# Altium PCB Balancer-v7.0.1.PcbDoc (part 1 of 3)
Units mil, origin at the board's own origin, x right, y up, seen from the top; angles counter-clockwise.
Board outline 2856.3 x 1161.42 mil, 2 copper layers (Top Layer, Bottom Layer), stack 30.709 mil thick; 20 components, 16 nets, 58 pads, 112 vias.
Unrouted connection lines stored in the file: 10.
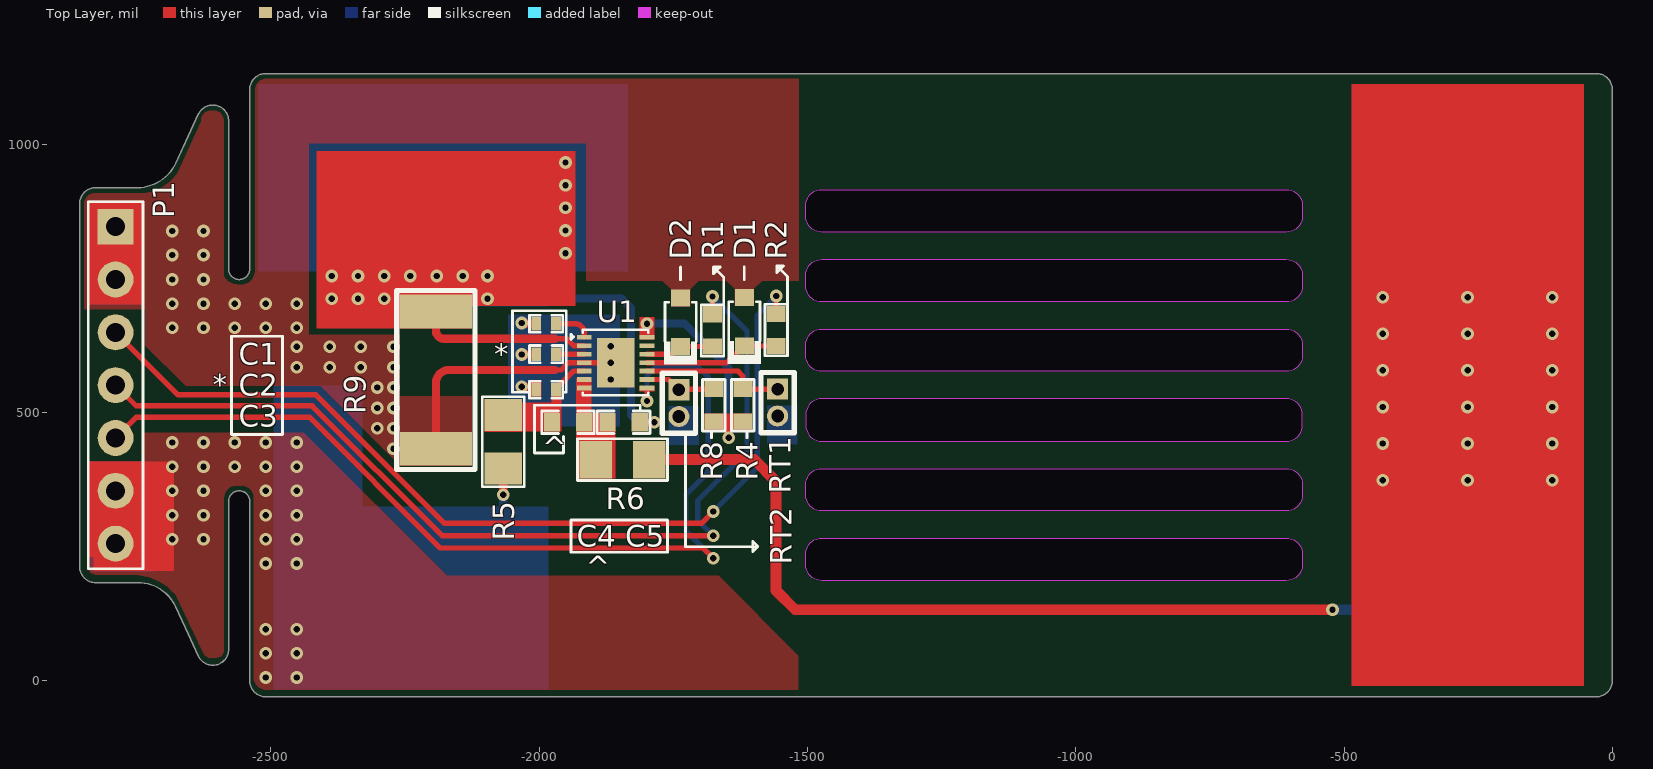
[diagram p0: Top Layer view]
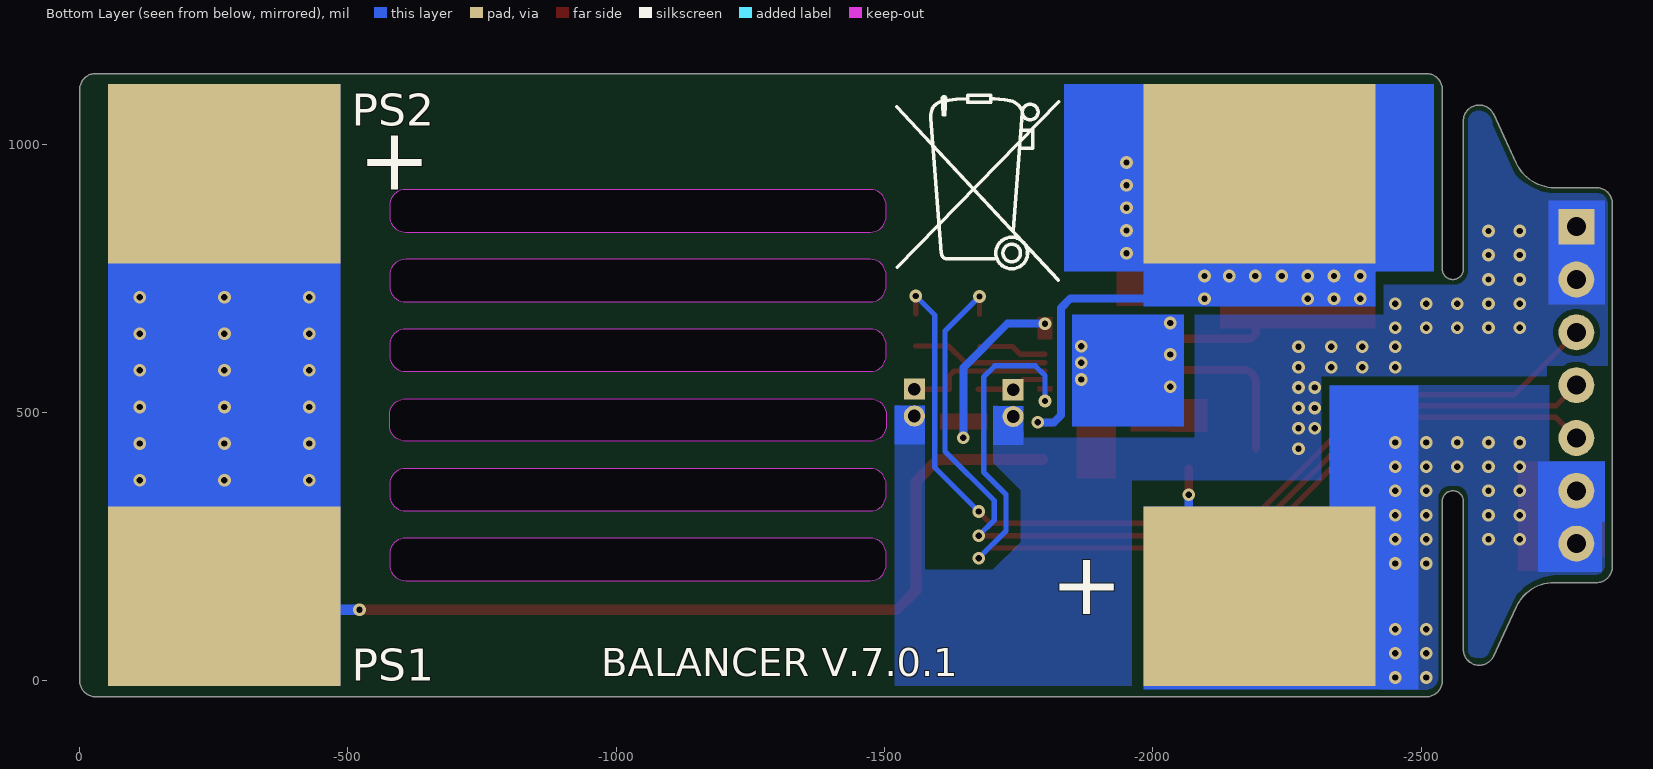
[diagram p1: Bottom Layer view, seen from below]
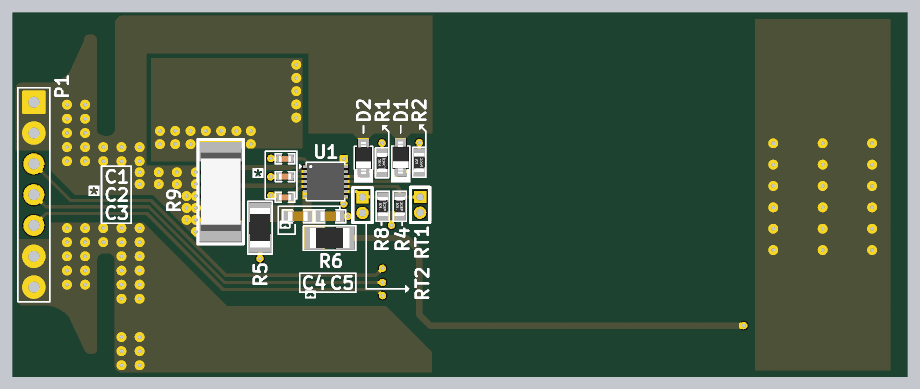
[diagram p3: 3D render of the assembled board from above, using the file's embedded part models]

## Layer stack, top to bottom
Top Solder: solder mask 0.4, Solder Resist, Dk 3.5
Top Layer: signal copper 2.9528
Dielectric 1: core 24.8031, FR-4, Dk 4.8
Bottom Layer: signal copper 2.9528
Bottom Solder: solder mask 0.4, Solder Resist, Dk 3.5

## Board outline
-2826.77,183.1 -2741.77,183.1 -2741.76,183.1 cw(c-2748.65,104.66) -2677.28,137.91 -2653.81,87.52 -2635.04,46.17 ccw(c-2608.27,58.64) -2578.74,58.64 -2578.74,334.65 cw(c-2559.06,334.65) -2539.37,334.65 -2539.37,0 ccw(c-2509.84,0) -2509.84,-29.53 -29.53,-29.53 ccw(c-29.53,0) 0,0 0,1102.36 ccw(c-29.53,1102.36) -29.53,1131.89 -2509.84,1131.89 ccw(c-2509.84,1102.36) -2539.37,1102.36 -2539.37,767.72 cw(c-2559.06,767.72) -2578.74,767.72 -2578.74,1043.72 ccw(c-2578.76,1043.73) -2578.74,1043.73 -2578.85,1046.31 ccw(c-2608.27,1043.72) -2602.34,1072.65 ccw(c-2608.27,1043.72) -2635.04,1056.19 -2654.15,1015.14 -2677.63,964.75 -2677.64,964.72 cw(c-2749,998) -2749,919.26 -2826.77,919.26 -2829.35,919.15 ccw(c-2826.77,889.73) -2856.3,889.73 -2856.3,212.63 ccw(c-2826.77,212.63)
cut-out: -1503.09,866.14 -1503.09,885.83 cw(c-1473.43,885.83) -1473.43,915.5 -607.28,915.5 cw(c-607.28,885.83) -577.61,885.83 -577.61,866.14 cw(c-607.28,866.14) -607.28,836.47 -1473.43,836.47 cw(c-1473.43,866.14)
cut-out: -1503.09,736.22 -1503.09,755.91 cw(c-1473.43,755.91) -1473.43,785.57 -607.28,785.57 cw(c-607.28,755.91) -577.61,755.91 -577.61,736.22 cw(c-607.28,736.22) -607.28,706.55 -1473.43,706.55 cw(c-1473.43,736.22)
cut-out: -1503.09,216.54 -1503.09,236.22 cw(c-1473.43,236.22) -1473.43,265.89 -607.28,265.89 cw(c-607.28,236.22) -577.61,236.22 -577.61,216.54 cw(c-607.28,216.54) -607.28,186.87 -1473.43,186.87 cw(c-1473.43,216.54)
cut-out: -1503.09,346.46 -1503.09,366.14 cw(c-1473.43,366.14) -1473.43,395.81 -607.28,395.81 cw(c-607.28,366.14) -577.61,366.14 -577.61,346.46 cw(c-607.28,346.46) -607.28,316.79 -1473.43,316.79 cw(c-1473.43,346.46)
cut-out: -1503.09,476.38 ccw(c-1473.43,476.38) -1473.43,446.71 -607.28,446.71 ccw(c-607.28,476.38) -577.61,476.38 -577.61,496.06 ccw(c-607.28,496.06) -607.28,525.73 -1473.43,525.73 ccw(c-1473.43,496.06) -1503.09,496.06
cut-out: -1503.09,606.3 -1503.09,625.98 cw(c-1473.43,625.98) -1473.43,655.65 -607.28,655.65 cw(c-607.28,625.98) -577.61,625.98 -577.61,606.3 cw(c-607.28,606.3) -607.28,576.63 -1473.43,576.63 cw(c-1473.43,606.3)

## Design rules (kind name [scope] priority, off if disabled: settings)
Clearance [All] p1: gap=10 ignorepadtopadclearanceinfootprint=TRUE except(0: Arc-Hole Track-Hole SMDPad-Hole THPad-Hole Via-Hole Fill-Hole Poly-Hole Region-Hole Text-Hole; 5: Arc-Arc Arc-Track Track-Track; 6: Arc-SMDPad Track-SMDPad; 7: Arc-Fill Arc-Poly Arc-Region Track-Fill Track-Poly Track-Region SMDPad-Fill SMDPad-Poly SMDPad-Region)
ComponentClearance [All] p1: gap=0 collisioncheckmode=3 verticalgap=0 showdistances=FALSE
MinimumSolderMaskSliver [All] p1: minsoldermaskwidth=0
PolygonConnect [All] p1: thpad.connectstyle=Relief thpad.reliefconductorwidth=15 thpad.reliefentries=4 thpad.polygonreliefangle="45 Angle" thpad.airgapwidth=10 smdpad.connectstyle=Direct smdpad.reliefconductorwidth=10 smdpad.reliefentries=4 smdpad.polygonreliefangle="90 Angle" smdpad.airgapwidth=10 via.connectstyle=Direct via.reliefconductorwidth=10 via.reliefentries=4 via.polygonreliefangle="90 Angle" via.airgapwidth=10
RoutingVias [All] p1: holewidth=11.81 width=23.62 viastyle="Through Hole" minholewidth=11.81 minwidth=23.62 maxholewidth=11.81 maxwidth=23.62
SilkToSilkClearance [All] p1: silktosilkclearance=0
SilkToSolderMaskClearance [IsPad] p1: minsilkscreentomaskgap=0 clearancetoexposedcopper=TRUE
SolderMaskExpansion [All] p1: expansion=4 istentingtop=FALSE
UnRoutedNet [All] p1: checkbadconnections=TRUE
Width [All] p1: maxlimit=40 minlimit=8 preferedwidth=10
25 further rules are at their usual default settings.

## Components (designator, comment, footprint, x,y, rotation, side; value= is the part's Value field where it differs from the comment)
C1 "0.47uF" Cap-0402 -1987.1,665.68 r0 top locked
C2 "0.47uF" Cap-0402 -1987.1,608.98 r0 top locked
C3 "0.1uF" Cap-0402 -1987.1,542.68 r0 top locked value=100nF
C4 "1nF" Cap-0603 -1946.07,481.92 r0 top locked
C5 "1nF" Cap-0603 -1842.56,481.92 r0 top locked
D1 "BZX38450-C4V7-QX" SOD-323 -1617.56,669.41 r90 top
D2 "BZX38450-C4V7-QX" SOD-323 -1736.48,668.51 r90 top
P1 "2.5mm" "Header CON" -2789.37,551.15 r270 top locked
PS1 "3.7V" "18650 CELL PAD" -2198.82,157.48 r0 bottom locked
PS2 "3.7V" "18650 CELL PAD" -269.68,944.89 r180 bottom locked
R1 "150R" Res-0603 -1677.06,653.23 r90 top locked
R2 "150R" Res-0603 -1558.15,654.13 r90 top locked
R4 "10K" Res-0603 -1620.56,513.68 r90 top locked value=10kR
R5 "10R" Res-1206 -2066.96,445.67 r90 top locked
R6 "100R" Res-1206 -1844.72,412.41 r180 top locked
R8 "10K" Res-0603 -1674.56,513.68 r90 top locked value=10kR
R9 "2.5mR" RES-2512 -2192.56,560.68 r270 top locked
RT1 "DNP NTC 10K" Thermistor -1555.56,518.68 r270 top locked
RT2 "DNP NTC 10K" Thermistor -1739.56,517.68 r270 top locked
U1 "MAX17205G+" TDFN-14-EP(3x3) -1857.6,593.23 r0 top locked

## Footprints (in the part's own frame and the unit in brackets; to place one, negate y for a bottom-side part, rotate by r counter-clockwise, add the part's x,y. Pads: shape width x height; smd on the part's side, far side on the other; paste and mask are expansions set on the pad)
"18650 CELL PAD" [mm]
  rect 11x8.5 smd: 1(0,0) 2(49,0)
Cap-0402 [mil]
  rect 18x25 smd mask+2.36: 1(-18.5,0) 2(18.5,0)
  silkscreen extent -31,-16 31,16, body extent -20,-10 20,10, height 19
Cap-0603 [mil]
  rect 30x35 smd mask+2.36: 1(-30,0) 2(30,0)
  silkscreen extent -49,-21 49,21, body extent -32,-16 31,16, height 34
"Header CON" [mm]
  rect 1.7x1.7 hole 0.9: 1(-7.5,0)
  round 1.7 hole 0.9: 2(-5,0) 3(-2.5,0) 4(0,0) 5(2.5,0) 6(5,0) 7(7.5,0)
  silkscreen extent -8.69,-1.3 8.69,1.3
Res-0603 [mil]
  rect 30x35 smd: 1(-30,0) 2(30,0)
  silkscreen extent -48,-21 48,21, body extent -31,-17 31,17, height 18
Res-1206 [mil]
  rect 60x70 smd: 1(-50,0) 2(50,0)
  silkscreen extent -84,-39 84,39, body extent -63,-31 63,31, height 24
RES-2512 [mm]
  rect 1.6x3.4 smd: 1(-3.25,0) 2(3.25,0)
  silkscreen extent -4.24,-1.85 4.24,1.85, body extent -3.17,-1.63 3.18,1.63, height 0.58
SOD-323 [mm]
  rect 0.8x0.9 smd mask+0.055: 1(-1.15,0) 2(1.15,0)
  silkscreen extent -2.01,-0.79 0.94,0.79, body extent -1.3,-0.67 1.3,0.67, height 1.1
TDFN-14-EP(3x3) [mm]
  rect 0.7x0.22 smd: 1(-1.485,1.2) 2(-1.485,0.8) 3(-1.485,0.4) 4(-1.485,0) 5(-1.485,-0.4) 6(-1.485,-0.8) 7(-1.485,-1.2) 8(1.485,-1.2) 9(1.485,-0.8) 10(1.485,-0.4) 11(1.485,0) 12(1.485,0.4) 13(1.485,0.8) 14(1.485,1.2)
  rect 1.78x2.35 smd paste-2: 15(0,0)
  silkscreen extent -2.11,-1.55 1.55,1.55, body extent -1.5,-1.5 1.5,1.5, height 0.77
Thermistor [mm]
  rect 1x1 hole 0.6: 1(-0.635,0)
  round 1 hole 0.6: 2(0.635,0)
  silkscreen extent -1.42,-0.79 1.42,0.79

## Part data
C1 C2: library part GRM155R71C474KE01D, "CAP CER 0.47uF, 16V, X7R, 10% Tol, 0402 Multilayer Ceramic Capacitors MLCC - SMD/SMT ROHS", LCSC Part Number=C471404, Manufacturer="Murata Electronics", Package=0402, Item Type=Capacitor, Manufacturer Part Number=GRM155R71C474KE01D
C3: library part 04023C104KAT2A, "CAP CER, 0.1 uF, 25 V, ± 10%, X7R, 0402 [1005 Metric]", Case Code (Imperial)=0402, Case Code (Metric)=1005, Dielectric=X7R, Manufacturer="Kyocera AVX", Max Operating Temperature=125°C, Min Operating Temperature=-55°C, Supplier Part Number=1867948, Tolerance=10%, Voltage=25V, Case/Package=0402, Category="Ceramic Capacitors", ComponentLink1Description=https://datasheet.ciiva.com/7614/cx7r-7614663.pdf?src-supplier=Digi-Key, ComponentLink1URL=https://datasheet.ciiva.com/7614/cx7r-7614663.pdf?src-supplier=Digi-Key, ComponentLink2Description=https://datasheet.ciiva.com/6265/cx7r-6265272.pdf?src-supplier=Digi-Key, ComponentLink2URL=https://datasheet.ciiva.com/6265/cx7r-6265272.pdf?src-supplier=Digi-Key, ComponentLink3Description=https://datasheet.ciiva.com/1123/1679506-1123344.pdf?src-supplier=Element14, ComponentLink3URL=https://datasheet.ciiva.com/1123/1679506-1123344.pdf?src-supplier=Element14, ComponentLink4Description=https://datasheet.ciiva.com/14906/cx7r-14906223.pdf?src-supplier=Digi-Key, ComponentLink4URL=https://datasheet.ciiva.com/14906/cx7r-14906223.pdf?src-supplier=Digi-Key, ComponentLink5Description=https://datasheet.ciiva.com/7709/1679506-7709527.pdf?src-supplier=Element14, ComponentLink5URL=https://datasheet.ciiva.com/7709/1679506-7709527.pdf?src-supplier=Element14, ComponentLink6Description=Farnell, ComponentLink6URL=https://uk.farnell.com/avx/04023c104kat2a/cap-0-1-f-25v-10-x7r-0402/dp/1867948, Item Type=Capacitor, Lead Free=5697LeadFree, Manufacturer Part Number=04023C104KAT2A, Material=4241ConductorMaterial, Mounting Technology="Surface Mount", Packaging="Cut Tape", Pins=2, Pricing="10=0.027, 100=0.014, 500=0.009, 2500=0.007, 5000=0.0069 (GBP)", Reach SVHC Compliant=No, RoHS=Yes, RoHS Compliant=Yes, Series=-, Stock=226682, Supplier=Farnell, Voltage Rating=25V, Voltage Rating (DC)=25V, Width=1mm
C4 C5: library part C0603C102K3RACAUTO, "CAP CER, 1000 pF, 25 V, ± 10%, X7R, 0603 [1608 Metric]", Case Code (Imperial)=0603, Case Code (Metric)=1608, Dielectric=X7R, Dielectric Material=Ceramic, Manufacturer=KEMET, Max Operating Temperature=125°C, Min Operating Temperature=-55°C, Package Quantity=1, Ratings=AEC-Q200, Supplier Part Number=07X0745, Tolerance=10%, Voltage Rating=25V, Category="Ceramic Capacitors", ComponentLink1Description=https://datasheet.ciiva.com/23913/1751276-23913166.pdf?src-supplier=Newark, ComponentLink1URL=https://datasheet.ciiva.com/23913/1751276-23913166.pdf?src-supplier=Newark, ComponentLink2Description=https://datasheet.ciiva.com/26847/getdatasheetpartid-429233-26847500.pdf?src-supplier=Verical, ComponentLink2URL=https://datasheet.ciiva.com/26847/getdatasheetpartid-429233-26847500.pdf?src-supplier=Verical, ComponentLink3Description=Newark, ComponentLink3URL=https://www.newark.com/kemet/c0603c102k3racauto/mlcc-capacitor-1000pf-25v-x7r/dp/07X0745, Construction=Flat, Depth=0.8mm, Height=0.8mm, Item Type=Capacitor, Length=1.6mm, Manufacturer Part Number=C0603C102K3RACAUTO, Mounting Technology="Surface Mount", Package=0603, Packaging="Cut Tape", Pricing="1=0.014 (USD)", Radiation Hardening=No, Reach SVHC Compliant=No, RoHS=Yes, RoHS Compliant=Yes, Series=C, Stock=3765, Supplier=Newark, Thickness=0.034inch, Voltage Rating (DC)=25V, Width=0.031inch
D1 D2: "Zener Diode 4.7 V 300 mW ±5% Surface Mount SOD-323", Manufacturer="Nexperia USA Inc.", Package="SC-76, SOD-323", ComponentLink1Description=Farnell, ComponentLink1URL=https://uk.farnell.com/nexperia/bzx38450-c4v7-qx/zener-diode-4-7v-0-3w-sc-76/dp/3868843, ComponentLink2Description=Digikey, ComponentLink2URL=https://www.digikey.com/en/products/detail/nexperia-usa-inc/BZX38450-C4V7-QX/16368564, Item Type=Diode, Manufacturer Part Number=BZX38450-C4V7-QX
P1: library part "Header CON 2.5mm", "2.5mm Pitch, 7 Pin header Connector"
PS1 PS2: library part "18650 CELL", "Will only be pads on PCB for Welding. Not CELL holder"
R1 R2: library part MCWR06X1500FTL, "SMD RES, 150 Ohm, General Purpose Thick Film 0603 1% 1/10W ±100ppm/°C Ceramic Paper T/R", Case Code (Imperial)=0603, Case Code (Metric)=1608, Manufacturer=Multicomp, Power Rating=100mW, Resistance Tolerance=1%, Resistor Type="Thick Film", Supplier Part Number=2446572, Temperature Coefficient=100ppm/°C, Voltage Rating=50V, Case/Package=0603, ComponentLink1Description=http://www.farnell.com/datasheets/2563624.pdf?src-supplier=Farnell, ComponentLink1URL=http://www.farnell.com/datasheets/2563624.pdf?src-supplier=Farnell, ComponentLink2Description=http://www.farnell.com/datasheets/2860681.pdf?src-supplier=Farnell, ComponentLink2URL=http://www.farnell.com/datasheets/2860681.pdf?src-supplier=Farnell, ComponentLink3Description=https://datasheet.octopart.com/MCWR06X1500FTL-Multicomp-datasheet-100454308.pdf?src-supplier=Farnell, ComponentLink3URL=https://datasheet.octopart.com/MCWR06X1500FTL-Multicomp-datasheet-100454308.pdf?src-supplier=Farnell, ComponentLink4Description=http://www.farnell.com/datasheets/1849611.pdf?src-supplier=Element14, ComponentLink4URL=http://www.farnell.com/datasheets/1849611.pdf?src-supplier=Element14, ComponentLink5Description=http://www.farnell.com/datasheets/2563624.pdf?src-supplier=Newark, ComponentLink5URL=http://www.farnell.com/datasheets/2563624.pdf?src-supplier=Newark, Item Type=Resistor, Manufacturer Part Number=MCWR06X1500FTL, Packaging="Tape and Reel", Pricing="5000=0.001, 25000=0.0009, 50000=0.0008 (GBP)", Reach SVHC Compliant=No, RoHS=Yes, Stock=85000, Supplier=Farnell, Voltage Rating (DC)=50V
R4 R8: library part RE0603DRE0710KL, "SMD RES, 10KOhm, ± 0.5%, 100 mW, 0603 [1608 Metric], Thick Film, Ultra Precision", Case/Package=0603, Manufacturer=Yageo, Max Operating Temperature=155°C, Max Power Dissipation=100mW, Min Operating Temperature=-55°C, Supplier Part Number=1840588, Temperature Coefficient=50ppm/°C, Tolerance=0.5%, Category="Chip SMD Resistors", ComponentLink1Description=http://www.yageo.com/NewPortal/yageodocoutput?fileName=/pdf/R-Chip/PYu-RE_105_RoHS_L_6.pdf&src-supplier=Digi-Key, ComponentLink1URL=http://www.yageo.com/NewPortal/yageodocoutput?fileName=/pdf/R-Chip/PYu-RE_105_RoHS_L_6.pdf&src-supplier=Digi-Key, ComponentLink2Description=Farnell, ComponentLink2URL=https://uk.farnell.com/yageo/re0603dr-0710kl/res-10k-0-5-0-1w-0603-thick-film/dp/1840588, Features="Moisture Resistant", Height=0.022inch, Item Type=Resistor, Length=0.063inch, Manufacturer Part Number=RE0603DRE0710KL, Number of Terminations=2, Packaging="Tape and Reel", Pricing="10=0.025, 100=0.014, 500=0.013, 1000=0.011, 2500=0.009, 5000=0.007, 25000=0.006, 50000=0.005 (GBP)", RoHS=Yes, RoHS Compliant=Yes, Series=RE, Stock=3920, Supplier=Farnell, Width=0.032inch
R5: library part RC1206FR-0710RL, "SMD RES, 10 Ohm, ± 1%, 250 mW, 1206 [3216 Metric], Thick Film, General Purpose", Case Code (Metric)=3216, Case/Package=1206, Manufacturer=Yageo, Max Operating Temperature=155°C, Max Power Dissipation=250mW, Min Operating Temperature=-55°C, Resistance Tolerance=1%, Resistor Type="Thick Film", Supplier Part Number=2421908, Temperature Coefficient=200ppm/°C, Voltage Rating=200V, Category="Chip SMD Resistors", ComponentLink1Description=https://datasheet.ciiva.com/11819/0900766b80c6630a-11819896.pdf?src-supplier=Rs, ComponentLink1URL=https://datasheet.ciiva.com/11819/0900766b80c6630a-11819896.pdf?src-supplier=Rs, ComponentLink2Description=https://datasheet.ciiva.com/22735/444357-22735648.pdf?src-supplier=Farnell, ComponentLink2URL=https://datasheet.ciiva.com/22735/444357-22735648.pdf?src-supplier=Farnell, ComponentLink3Description=https://datasheet.ciiva.com/29181/402303-da-01-en-smd-widerstand-chip1206-10-ohm-29181572.pdf?src-supplier=Conrad, ComponentLink3URL=https://datasheet.ciiva.com/29181/402303-da-01-en-smd-widerstand-chip1206-10-ohm-29181572.pdf?src-supplier=Conrad, ComponentLink4Description=https://datasheet.ciiva.com/46445/444357-46445704.pdf?src-supplier=Element14, ComponentLink4URL=https://datasheet.ciiva.com/46445/444357-46445704.pdf?src-supplier=Element14, ComponentLink5Description=https://datasheet.ciiva.com/2460/pyu-rc1206-51-rohs-l-4-2460048.pdf?src-supplier=Digi-Key, ComponentLink5URL=https://datasheet.ciiva.com/2460/pyu-rc1206-51-rohs-l-4-2460048.pdf?src-supplier=Digi-Key, ComponentLink6Description=https://datasheet.ciiva.com/2460/pyu-rc1206-51-rohs-l-4-2460049.pdf?src-supplier=Digi-Key, ComponentLink6URL=https://datasheet.ciiva.com/2460/pyu-rc1206-51-rohs-l-4-2460049.pdf?src-supplier=Digi-Key, ComponentLink7Description=https://datasheet.ciiva.com/2460/pyu-rc1206-51-rohs-l-4-2460050.pdf?src-supplier=Digi-Key, ComponentLink7URL=https://datasheet.ciiva.com/2460/pyu-rc1206-51-rohs-l-4-2460050.pdf?src-supplier=Digi-Key, ComponentLink8Description=https://datasheet.ciiva.com/16962/pyu-rc1206-51-rohs-l-4-16962857.pdf?src-supplier=Future+Electronics, ComponentLink8URL=https://datasheet.ciiva.com/16962/pyu-rc1206-51-rohs-l-4-16962857.pdf?src-supplier=Future+Electronics, ComponentLink9Description=Farnell, ComponentLink9URL=https://uk.farnell.com/yageo/rc1206fr-0710rl/res-10r-1-0-25w-1206-thick-film/dp/2421908, Depth=1.6mm, Features="Moisture Resistant", Height=0.55mm, Item Type=Resistor, Lead Free="Lead Free", Length=3.1mm, Manufacturer Part Number=RC1206FR-0710RL, Number of Terminations=2, Package=1206, Packaging="Tape and Reel", Pins=2, Power Rating=250mW, Pricing="5000=0.016, 25000=0.014, 50000=0.012 (GBP)", Reach SVHC Compliant=No, RoHS=Yes, RoHS Compliant=Yes, Series=RC, Stock=95000, Supplier=Farnell, Technology="THICK FILM", Termination=SMD/SMT, Tolerance=1%, Voltage Rating (AC)=200V, Voltage Rating (DC)=200V, Width=1.6mm
R6: library part RC1206FR-07100RL, "SMD RES, 100 Ohm, ± 1%, 250 mW, 1206 [3216 Metric], Thick Film, General Purpose", Case Code (Imperial)=1206, Case Code (Metric)=3216, Manufacturer=Yageo, Max Operating Temperature=155°C, Max Power Dissipation=250mW, Min Operating Temperature=-55°C, Package Quantity=5000, Resistance Tolerance=1%, Resistor Type="Thick Film", Supplier Part Number=9240888, Temperature Coefficient=100ppm/°C, Voltage Rating=200V, Category="Chip SMD Resistors", ComponentLink1Description=https://datasheet.ciiva.com/11808/0900766b80c6630a-11808606.pdf?src-supplier=Rs, ComponentLink1URL=https://datasheet.ciiva.com/11808/0900766b80c6630a-11808606.pdf?src-supplier=Rs, ComponentLink2Description=https://datasheet.ciiva.com/46445/444357-46445702.pdf?src-supplier=Element14, ComponentLink2URL=https://datasheet.ciiva.com/46445/444357-46445702.pdf?src-supplier=Element14, ComponentLink3Description=https://datasheet.ciiva.com/7857/444357-7857241.pdf?src-supplier=Element14, ComponentLink3URL=https://datasheet.ciiva.com/7857/444357-7857241.pdf?src-supplier=Element14, ComponentLink4Description=https://datasheet.ciiva.com/7857/444357-7857242.pdf?src-supplier=Element14, ComponentLink4URL=https://datasheet.ciiva.com/7857/444357-7857242.pdf?src-supplier=Element14, ComponentLink5Description=Farnell, ComponentLink5URL=https://uk.farnell.com/yageo/rc1206fr-07100rl/res-100r-1-0-25w-1206-thick-film/dp/9240888, Depth=1.6mm, Features="Moisture Resistant", Height=0.55mm, Item Type=Resistor, Lead Free="Lead Free", Length=3.1mm, Manufacturer Part Number=RC1206FR-07100RL, Number of Terminations=2, Package=1206, Packaging="Tape and Reel", Power Rating=250mW, Pricing="10=0.022, 100=0.013, 500=0.011, 1000=0.009, 2500=0.0088 (GBP)", Reach SVHC Compliant=Unknown, RoHS=Yes, RoHS Compliant=Yes, Series=RC, Stock=538979, Supplier=Farnell, Technology="THICK FILM", Termination=SMD/SMT, Tolerance=1%, Voltage Rating (AC)=200V, Width=1.6mm
R9: library part PA2512FKF7W2U5E, "SMD Current Sense Resistor, 0.0025 ohm, PA Series, 2512 [6432 Metric], 2W, ± 1%, Metal Strip", Manufacturer=YAGEO, Package=2512, ComponentLink1Description=Farnell, ComponentLink1URL=https://nl.farnell.com/yageo/pa2512fkf7w2u5e/res-r0025-1-2w-2512-metal-strip/dp/4169831, Item Type=Resistor, Manufacturer Part Number=PA2512FKF7W2U5E
RT1 RT2: library part Thermister, "NTC Thermister 10K"
U1: "Stand-Alone ModelGauge m5 Fuel Gauge with SHA-256 Authentication", Manufacturer=Maxim, Max Operating Temperature=85°C, Max Supply Voltage=20V, Min Operating Temperature=-40°C, Min Supply Voltage=4.2V, Package=TDFN-14-EP(3x3), Category="Battery Management", ComponentLink1Description=http://www.farnell.com/datasheets/2339113.pdf?src-supplier=Farnell, ComponentLink1URL=http://www.farnell.com/datasheets/2339113.pdf?src-supplier=Farnell, ComponentLink2Description=http://www.mouser.com/ds/2/256/MAX17201-MAX17215-909430.pdf?src-supplier=Mouser, ComponentLink2URL=http://www.mouser.com/ds/2/256/MAX17201-MAX17215-909430.pdf?src-supplier=Mouser, ComponentLink3Description=https://datasheets.maximintegrated.com/en/ds/MAX17201-MAX17215.pdf?src-supplier=Digi-Key, ComponentLink3URL=https://datasheets.maximintegrated.com/en/ds/MAX17201-MAX17215.pdf?src-supplier=Digi-Key, ComponentLink4Description=http://www.farnell.com/datasheets/2034561.pdf?src-supplier=Element14, ComponentLink4URL=http://www.farnell.com/datasheets/2034561.pdf?src-supplier=Element14, Interface=I2C, Item Type=IC, Manufacturer Part Number=MAX17205G+, Number of Pins=14, Packaging=Rail/Tube, Pricing 1="1=6.58, 10=5.913, 25=5.5904, 80=4.845, 230=4.59652, 490=4.12443, 980=3.47844, 2450=3.30452 (USD)", Reach SVHC Compliant=Unknown, RoHS=Yes, RoHS Compliant=Yes, Series=ModelGauge™, Stock 1=490, Supplier 1=Digi-Key

## Via types
v1: diameter 23.62, hole 11.81, Top Layer to Bottom Layer, 112 vias

## Nets (pads, with @x,y where several pads share a name; then routed paths per layer and width w, separated by ;. In a path a pad name is that pad's centre, name@x,y a point inside that pad or via, vN(x,y) a via of type N, cw(c..) or ccw(c..) an arc to the next point about the centre after c; other vN are vias at no path point)
ALRT: P1.5 U1.8 | length 1815.1
  Top Layer w10: P1.5@-2789.37,452.72 -2750.66,491.43 -2428.43,491.43 -2184.68,247.68 -1694.56,247.68 v1(-1675.56,228.68) ; U1.8@-1799.14,544.06 -1799.14,521.78 v1(-1799.04,521.68)
  Bottom Layer w10: v1(-1799.04,521.68) -1799.04,568.86 -1780.58,587.31 -1705.56,587.31 -1684.56,566.31 -1684.56,389.57 -1726.44,347.7 -1726.44,279.55 v1(-1675.56,228.68)
C1: P1.6 P1.7 PS1.1 R5.1 | length 391.2
  Top Layer w15: P1.7@-2789.37,255.87 P1.6@-2789.37,354.3 ; v1(-2066.96,346.68) R5.1@-2066.96,395.67
  Bottom Layer w15: PS1.1@-2198.82,157.48 -2066.96,289.33 v1(-2066.96,346.68)
  other v1: -2509.56,6.29 -2451.56,6.29 -2509.56,51.29 -2451.56,51.29 -2509.56,96.29 -2451.56,96.29 -2509.56,218.68 -2451.56,218.68 -2683.56,263.68 -2625.56,263.68 -2509.56,263.68 -2451.56,263.68 -2683.56,308.68 -2625.56,308.68 -2509.56,308.68 -2451.56,308.68 -2683.56,354.3 -2625.56,354.3 -2509.56,354.3 -2451.56,354.3 -2683.56,399.3 -2625.56,399.3 -2567.56,399.3 -2509.56,399.3 -2451.56,399.3 -2683.56,444.3 -2625.56,444.3 -2567.56,444.3 -2509.56,444.3 -2451.56,444.3
C2: PS1.2 PS2.1 R6.1 | length 1770.3
  Top Layer w20: R6.1@-1794.72,412.41 -1599.27,412.41 -1558.67,371.82 -1558.67,168.46 -1522.89,132.68 v1(-521.56,132.68)
  Bottom Layer w20: v1(-521.56,132.68) -294.48,132.68 PS1.2@-269.68,157.48
  other v1: -427.56,374.11 -269.68,374.11 -111.8,374.11 -427.56,442.33 -269.68,442.33 -111.8,442.33 -427.56,510.56 -269.68,510.56 -111.8,510.56 -427.56,578.79 -269.68,578.79 -111.8,578.79 -427.56,647.01 -269.68,647.01 -111.8,647.01 -427.56,715.24 -269.68,715.24 -111.8,715.24
C2-: C5.2 PS2.2 R9.1 U1.2 | length 940
  Top Layer w10: -1970.56,637.68 -1948.84,637.68 -1935.89,624.73 U1.2@-1916.07,624.73
  Top Layer w15: R9.1@-2192.56,688.63 -2192.56,653.18 ccw(c-2177.06,653.18) -2177.06,637.68 -1970.56,637.68 ; C5.2@-1812.56,481.92 v1(-1785.36,481.92)
  Bottom Layer w15: PS2.2@-2198.82,904.94 PS2.2@-2177.6,904.94 ; v1(-2142.28,754.68) v1@-2136.9,760.06 ; v1(-2096.28,712.45) -1846.19,712.45 -1828.9,695.16 -1828.9,495.11 -1815.71,481.92 v1(-1785.36,481.92) ; PS2.2@-2057.72,785.06 -2057.72,763.85 -2048.55,754.68
  other v1: -2386.56,712.45 -2337.71,712.45 -2288.85,712.45 -2386.56,754.68 -2337.71,754.68 -2288.85,754.68 -2239.99,754.68 -2191.13,754.68 -2096.28,754.68 -1951,797.23 -1951,839.45 -1951,881.68 -1951,923.91 -1951,966.13
GND: C1.1 C2.1 C3.1 D1.2 D2.2 P1.1 P1.2 R9.2 RT1.2 RT2.2 U1.4 U1.15 | length 563.4
  Top Layer w10: v1@-2031.56,608.37 v1@-2031.26,608.68 ; C2.1@-2004.91,608.68 C2.1@-2004.6,608.98 ; -1970.56,579.49 -1958.81,579.49 -1945.07,593.23 U1.4@-1916.07,593.23 U1.15@-1857.6,593.23
  Top Layer w15: R9.2@-2192.56,432.73 -2192.56,554.68 cw(c-2167.75,554.68) -2167.75,579.49 -1970.56,579.49 ; v1@-2032.26,608.68 C2.1@-2005.91,608.68 ; v1@-2031.91,666.34 C1.1@-2006.22,666.34 ; v1@-2031.56,666.99 v1@-2030.91,666.34 ; v1@-2030.91,546.83 -2032.09,548 -2008.27,548 -2005.6,545.33 C3.1@-2005.6,542.68 ; C1.1@-2005.22,666.34 C1.1@-2004.58,665.7
  other v1: -2271.56,432.68 -2301.56,470.68 -2271.56,470.68 -2301.56,508.68 -2271.56,508.68 -2301.56,546.68 -2271.56,546.68 -2032.56,548.48 -1866.56,561.68 -2451.56,584.68 -2390.56,584.68 -2332.56,584.68 -2271.56,584.68 -1866.56,592.68 -2032.56,608.37 -2451.56,622.68 -2390.56,622.68 -2332.56,622.68 -2271.56,622.68 -1866.56,623.68 -2683.56,658 -2625.56,658 -2567.56,658 -2509.56,658 -2451.56,658 -2032.56,666.99 -2683.56,703 -2625.56,703 -2567.56,703 -2509.56,703 -2451.56,703 -2683.56,748 -2625.56,748 -2683.56,793.61 -2625.56,793.61 -2683.56,838.61 -2625.56,838.61
NetC1_2: C1.2 U1.1 | length 68.6
  Top Layer w10: C1.2@-1967.6,665.68 -1933.39,665.68 cw(c-1933.39,648.35) -1916.07,648.35 U1.1@-1916.07,641.15
NetC2_2: C2.2 U1.3 | length 51.5
  Top Layer w10: C2.2@-1967.6,608.98 U1.3@-1916.07,608.98
NetC3_2: C3.2 C4.1 R5.2 U1.5 | length 75.2
  Top Layer w10: C3.2@-1971.6,542.18 -1963.6,550.18 -1963.2,550.18 -1935.89,577.48 U1.5@-1916.07,577.48
  Top Layer w15: R5.2@-2066.96,505.68 R5.2@-2061.96,505.68
NetC4_2: C4.2 C5.1 R6.2 U1.6 U1.7
NetD1_1: D1.1 R2.1 U1.11 | length 253.8
  Top Layer w10: U1.11@-1799.14,593.23 -1650.43,593.23 -1619.53,624.13 D1.1@-1617.56,624.13 R2.1@-1558.15,624.13
NetD2_1: D2.1 R1.1 U1.12 | length 128
  Top Layer w10: U1.12@-1799.14,608.98 -1752.7,608.98 -1738.45,623.23 D2.1@-1736.48,623.23 R1.1@-1677.06,623.23
NetR4_2: R4.2 RT1.1 U1.10 | length 271.9
  Top Layer w10: U1.10@-1799.14,577.48 -1629.84,577.48 -1620.56,568.21 R4.2@-1620.56,543.68 RT1.1@-1555.56,543.68
NetR8_2: R8.2 RT2.1 U1.9 | length 134.3
  Top Layer w10: U1.9@-1799.14,561.74 -1758.62,561.74 RT2.1@-1739.56,542.68 -1738.56,543.68 R8.2@-1678.15,543.68 ; R8.2@-1679.15,542.68 R8.2@-1678.15,543.68 ; R8.2@-1674.56,543.68 R8.2@-1678.15,543.68
SCL: P1.3 R2.2 | length 1753.8
  Top Layer w10: P1.3@-2789.37,649.57 -2672.77,532.98 -2415.85,532.98 -2176.55,293.68 -1697.56,293.68 v1(-1675.56,315.68) ; R2.2@-1558.15,684.13 v1(-1558.15,717.31)
  Bottom Layer w10: v1(-1675.56,315.68) -1593.56,397.68 -1593.56,681.89 v1(-1558.15,717.31)
SDA: P1.4 R1.2 | length 1785.7
  Top Layer w10: P1.4@-2789.37,551.15 -2750.93,512.71 -2423.18,512.71 -2181.15,270.68 v1(-1675.56,270.68) ; R1.2@-1677.06,683.23 v1(-1677.06,716.41)
  Bottom Layer w10: v1(-1677.06,716.41) -1612.56,651.91 -1612.56,427.73 -1704.59,335.7 -1704.59,299.71 v1(-1675.56,270.68)
THRM: R4.1 R8.1 U1.14 | length 345.2
  Top Layer w10: v1@-1799.09,665.63 v1(-1799.04,665.68)
  Top Layer w15: v1(-1646.84,453.33) -1646.84,481.92
  Bottom Layer w15: v1(-1799.04,665.68) -1728.8,665.68 -1646.84,583.73 v1(-1646.84,453.33)
pads on no net: U1.13

## Polygon pours and split planes (outlines as drawn)
C1 on Top Layer "C1_L01_P006" (solid, pour order 6): -1665.68,195.68 -1517,47 -1517,-16.32 -2508.56,-16.32 cw(c-2508.57,6.68) -2531.56,6.68 -2531.56,341.68 ccw(c-2553.56,341.69) -2553.56,363.68 -2564.56,363.68 ccw(c-2564.57,340.68) -2587.56,340.68 -2587.56,67.46 -2587.56,57.42 cw(c-2601.82,56.94) -2601.35,42.68 -2607.56,42.68 cw(c-2610,61.36) -2627.31,53.93 -2677.37,160.49 -2685.27,168.39 ccw(c-2755.97,97.72) -2755.98,197.68 -2823.98,197.68 cw(c-2823.98,216.27) -2842.56,216.27 -2842.56,409.26 -2738.56,409.26 -2738.56,462.68 -2438.56,462.68 -2171.56,195.68
GND on Top Layer "GND_L01_P003" (solid, pour order 3): -1650.91,746.06 -1702.23,746.06 -1718.76,729.53 -1718.76,698.04 -1754.2,698.04 -1754.2,729.53 -1770.73,746.06 -1912,746.06 -1912,1002 -2429,1002 -2429,645 -2259.49,645 -2259.49,530.18 -2125.63,530.18 -2125.63,401.23 -2259.11,401.23 -2290.75,432.49 -2407.94,549.68 -2659.12,549.68 -2734.31,624.88 -2734.31,692.68 -2847.56,692.68 -2847.56,888 -2847.43,888.14 -2847.43,889.53 cw(c-2827.43,889.53) -2841.56,903.68 cw(c-2829.51,891.67) -2829.49,908.68 -2743.56,908.68 ccw(c-2743.56,988.59) -2687.05,932.09 -2674.25,944.89 -2629.56,1042.68 -2629.56,1045.87 cw(c-2612.74,1045.87) -2612.74,1062.7 -2604.82,1062.7 cw(c-2604.78,1048.17) -2594.49,1058.42 cw(c-2611.35,1041.51) -2587.47,1041.48 -2587.47,757.46 ccw(c-2574.41,757.46) -2583.65,748.22 ccw(c-2560.62,771.24) -2560.62,738.68 -2554.56,738.68 ccw(c-2554.56,763.68) -2529.56,763.68 -2529.56,1099.68 cw(c-2506.56,1099.68) -2506.56,1122.68 -1516.56,1122.68 -1516.56,746.06 -1584.21,746.06 -1599.85,730.43 -1599.85,698.93 -1635.28,698.93 -1635.28,730.43
GND on Bottom Solder "NONET_L01_P-001" (solid): -2721.89,578.84 -2650.02,578.84 ccw(c-2650.02,584.84) -2644.02,584.84 ccw(c-2650.02,584.84) -2650.02,590.84 -2721.89,590.84 ccw(c-2721.89,584.84) -2727.89,584.84 ccw(c-2721.89,584.84)
GND on Bottom Solder "NONET_L01_P-001" (solid): -2618.76,578.84 -2546.89,578.84 ccw(c-2546.89,584.84) -2540.89,584.84 ccw(c-2546.89,584.84) -2546.89,590.84 -2618.76,590.84 ccw(c-2618.76,584.84) -2624.76,584.84 ccw(c-2618.76,584.84)
GND on Bottom Solder "NONET_L01_P-001" (solid): -2721.89,600.55 -2650.02,600.55 ccw(c-2650.02,606.55) -2644.02,606.55 ccw(c-2650.02,606.55) -2650.02,612.55 -2721.89,612.55 ccw(c-2721.89,606.55) -2727.89,606.55 ccw(c-2721.89,606.55)
GND on Bottom Solder "NONET_L01_P-001" (solid): -2721.89,622.26 -2650.02,622.26 ccw(c-2650.02,628.26) -2644.02,628.26 ccw(c-2650.02,628.26) -2650.02,634.26 -2721.89,634.26 ccw(c-2721.89,628.26) -2727.89,628.26 ccw(c-2721.89,628.26)
GND on Bottom Solder "NONET_L01_P-001" (solid): -2546.89,600.55 -2618.76,600.55 cw(c-2618.76,606.55) -2624.76,606.55 cw(c-2618.76,606.55) -2618.76,612.55 -2546.89,612.55 cw(c-2546.89,606.55) -2540.89,606.55 cw(c-2546.89,606.55)
GND on Bottom Solder "NONET_L01_P-001" (solid): -2618.76,634.26 -2546.89,634.26 cw(c-2546.89,628.26) -2540.89,628.26 cw(c-2546.89,628.26) -2546.89,622.26 -2618.76,622.26 cw(c-2618.76,628.26) -2624.76,628.26 cw(c-2618.76,628.26)
C2- on Bottom Solder "NONET_L01_P-001" (solid): -1844.06,798 -1915.94,798 ccw(c-1915.94,792) -1921.94,792 ccw(c-1915.94,792) -1915.94,786 -1844.06,786 ccw(c-1844.06,792) -1838.06,792 ccw(c-1844.06,792)
C2- on Bottom Solder "NONET_L01_P-001" (solid): -1916.19,829.42 -1844.32,829.42 ccw(c-1844.32,835.42) -1838.32,835.42 ccw(c-1844.32,835.42) -1844.32,841.42 -1916.19,841.42 ccw(c-1916.19,835.42) -1922.19,835.42 ccw(c-1916.19,835.42)
C2- on Bottom Solder "NONET_L01_P-001" (solid): -1915.94,807.71 -1844.06,807.71 ccw(c-1844.06,813.71) -1838.06,813.71 ccw(c-1844.06,813.71) -1844.06,819.71 -1915.94,819.71 ccw(c-1915.94,813.71) -1921.94,813.71 ccw(c-1915.94,813.71)
C2- on Bottom Solder "NONET_L01_P-001" (solid): -1844.19,884.84 -1916.06,884.84 ccw(c-1916.06,878.84) -1922.06,878.84 ccw(c-1916.06,878.84) -1916.06,872.84 -1844.19,872.84 ccw(c-1844.19,878.84) -1838.19,878.84 ccw(c-1844.19,878.84)
C2- on Bottom Solder "NONET_L01_P-001" (solid): -1916.13,851.13 -1844.25,851.13 ccw(c-1844.25,857.13) -1838.25,857.13 ccw(c-1844.25,857.13) -1844.25,863.13 -1916.13,863.13 ccw(c-1916.13,857.13) -1922.13,857.13 ccw(c-1916.13,857.13)
C2- on Bottom Solder "NONET_L01_P-001" (solid): -1916.32,916.26 -1844.45,916.26 ccw(c-1844.45,922.26) -1838.45,922.26 ccw(c-1844.45,922.26) -1844.45,928.26 -1916.32,928.26 ccw(c-1916.32,922.26) -1922.32,922.26 ccw(c-1916.32,922.26)
C2- on Bottom Solder "NONET_L01_P-001" (solid): -1916.06,894.55 -1844.19,894.55 ccw(c-1844.19,900.55) -1838.19,900.55 ccw(c-1844.19,900.55) -1844.19,906.55 -1916.06,906.55 ccw(c-1916.06,900.55) -1922.06,900.55 ccw(c-1916.06,900.55)
C2- on Bottom Solder "NONET_L01_P-001" (solid): -1916.25,937.97 -1844.38,937.97 ccw(c-1844.38,943.97) -1838.38,943.97 ccw(c-1844.38,943.97) -1844.38,949.97 -1916.25,949.97 ccw(c-1916.25,943.97) -1922.25,943.97 ccw(c-1916.25,943.97)
C2- on Bottom Solder "NONET_L01_P-001" (solid): -1916.45,1003.09 -1844.57,1003.09 ccw(c-1844.57,1009.09) -1838.57,1009.09 ccw(c-1844.57,1009.09) -1844.57,1015.09 -1916.45,1015.09 ccw(c-1916.45,1009.09) -1922.45,1009.09 ccw(c-1916.45,1009.09)
C2- on Bottom Solder "NONET_L01_P-001" (solid): -1916.7,1024.8 -1844.83,1024.8 ccw(c-1844.83,1030.8) -1838.83,1030.8 ccw(c-1844.83,1030.8) -1844.83,1036.8 -1916.7,1036.8 ccw(c-1916.7,1030.8) -1922.7,1030.8 ccw(c-1916.7,1030.8)
C2- on Bottom Solder "NONET_L01_P-001" (solid): -1916.64,1068.22 -1844.76,1068.22 ccw(c-1844.76,1074.22) -1838.76,1074.22 ccw(c-1844.76,1074.22) -1844.76,1080.22 -1916.64,1080.22 ccw(c-1916.64,1074.22) -1922.64,1074.22 ccw(c-1916.64,1074.22)
C2- on Bottom Solder "NONET_L01_P-001" (solid): -1916.51,959.68 -1844.64,959.68 ccw(c-1844.64,965.68) -1838.64,965.68 ccw(c-1844.64,965.68) -1844.64,971.68 -1916.51,971.68 ccw(c-1916.51,965.68) -1922.51,965.68 ccw(c-1916.51,965.68)
C2- on Bottom Solder "NONET_L01_P-001" (solid): -1844.76,1058.51 -1916.64,1058.51 ccw(c-1916.64,1052.51) -1922.64,1052.51 ccw(c-1916.64,1052.51) -1916.64,1046.51 -1844.76,1046.51 ccw(c-1844.76,1052.51) -1838.76,1052.51 ccw(c-1844.76,1052.51)
C2- on Bottom Solder "NONET_L01_P-001" (solid): -1844.57,993.38 -1916.45,993.38 ccw(c-1916.45,987.38) -1922.45,987.38 ccw(c-1916.45,987.38) -1916.45,981.38 -1844.57,981.38 ccw(c-1844.57,987.38) -1838.57,987.38 ccw(c-1844.57,987.38)
C2- on Bottom Solder "NONET_L01_P-001" (solid): -1916.38,1089.93 -1844.51,1089.93 ccw(c-1844.51,1095.93) -1838.51,1095.93 ccw(c-1844.51,1095.93) -1844.51,1101.93 -1916.38,1101.93 ccw(c-1916.38,1095.93) -1922.38,1095.93 ccw(c-1916.38,1095.93)
C1 on Bottom Solder "NONET_L01_P-001" (solid): -2665.24,137.13 -2593.37,137.13 ccw(c-2593.37,143.13) -2587.37,143.13 ccw(c-2593.37,143.13) -2593.37,149.13 -2665.24,149.13 ccw(c-2665.24,143.13) -2671.24,143.13 ccw(c-2665.24,143.13)
C1 on Bottom Solder "NONET_L01_P-001" (solid): -2665.5,224.68 -2593.63,224.68 ccw(c-2593.63,230.68) -2587.63,230.68 ccw(c-2593.63,230.68) -2593.63,236.68 -2665.5,236.68 ccw(c-2665.5,230.68) -2671.5,230.68 ccw(c-2665.5,230.68)
C1 on Bottom Solder "NONET_L01_P-001" (solid): -2665.24,202.79 -2593.37,202.79 ccw(c-2593.37,208.79) -2587.37,208.79 ccw(c-2593.37,208.79) -2593.37,214.79 -2665.24,214.79 ccw(c-2665.24,208.79) -2671.24,208.79 ccw(c-2665.24,208.79)
C1 on Bottom Solder "NONET_L01_P-001" (solid): -2665.24,180.9 -2593.37,180.9 ccw(c-2593.37,186.9) -2587.37,186.9 ccw(c-2593.37,186.9) -2593.37,192.9 -2665.24,192.9 ccw(c-2665.24,186.9) -2671.24,186.9 ccw(c-2665.24,186.9)
C1 on Bottom Solder "NONET_L01_P-001" (solid): -2665.31,159.01 -2593.44,159.01 ccw(c-2593.44,165.01) -2587.44,165.01 ccw(c-2593.44,165.01) -2593.44,171.01 -2665.31,171.01 ccw(c-2665.31,165.01) -2671.31,165.01 ccw(c-2665.31,165.01)
GND on Bottom Solder "NONET_L01_P-001" (solid): -2272.63,665.68 -2200.76,665.68 ccw(c-2200.76,671.68) -2194.76,671.68 ccw(c-2200.76,671.68) -2200.76,677.68 -2272.63,677.68 ccw(c-2272.63,671.68) -2278.63,671.68 ccw(c-2272.63,671.68)
GND on Bottom Solder "NONET_L01_P-001" (solid): -2375.76,665.68 -2303.89,665.68 ccw(c-2303.89,671.68) -2297.89,671.68 ccw(c-2303.89,671.68) -2303.89,677.68 -2375.76,677.68 ccw(c-2375.76,671.68) -2381.76,671.68 ccw(c-2375.76,671.68)
GND on Bottom Solder "NONET_L01_P-001" (solid): -2169.5,665.68 -2097.63,665.68 ccw(c-2097.63,671.68) -2091.63,671.68 ccw(c-2097.63,671.68) -2097.63,677.68 -2169.5,677.68 ccw(c-2169.5,671.68) -2175.5,671.68 ccw(c-2169.5,671.68)
GND on Bottom Solder "NONET_L01_P-001" (solid): -2376.01,643.97 -2304.14,643.97 ccw(c-2304.14,649.97) -2298.14,649.97 ccw(c-2304.14,649.97) -2304.14,655.97 -2376.01,655.97 ccw(c-2376.01,649.97) -2382.01,649.97 ccw(c-2376.01,649.97)
GND on Bottom Solder "NONET_L01_P-001" (solid): -2272.88,643.97 -2201.01,643.97 ccw(c-2201.01,649.97) -2195.01,649.97 ccw(c-2201.01,649.97) -2201.01,655.97 -2272.88,655.97 ccw(c-2272.88,649.97) -2278.88,649.97 ccw(c-2272.88,649.97)
GND on Bottom Solder "NONET_L01_P-001" (solid): -2097.69,569.13 -2169.56,569.13 ccw(c-2169.56,563.13) -2175.56,563.13 ccw(c-2169.56,563.13) -2169.56,557.13 -2097.69,557.13 ccw(c-2097.69,563.13) -2091.69,563.13 ccw(c-2097.69,563.13)
GND on Bottom Solder "NONET_L01_P-001" (solid): -2097.56,460.59 -2169.44,460.59 ccw(c-2169.44,454.59) -2175.44,454.59 ccw(c-2169.44,454.59) -2169.44,448.59 -2097.56,448.59 ccw(c-2097.56,454.59) -2091.56,454.59 ccw(c-2097.56,454.59)
GND on Bottom Solder "NONET_L01_P-001" (solid): -2097.88,634.26 -2169.75,634.26 ccw(c-2169.75,628.26) -2175.75,628.26 ccw(c-2169.75,628.26) -2169.75,622.26 -2097.88,622.26 ccw(c-2097.88,628.26) -2091.88,628.26 ccw(c-2097.88,628.26)
GND on Bottom Solder "NONET_L01_P-001" (solid): -2169.63,535.42 -2097.75,535.42 ccw(c-2097.75,541.42) -2091.75,541.42 ccw(c-2097.75,541.42) -2097.75,547.42 -2169.63,547.42 ccw(c-2169.63,541.42) -2175.63,541.42 ccw(c-2169.63,541.42)
GND on Bottom Solder "NONET_L01_P-001" (solid): -2169.44,470.3 -2097.56,470.3 ccw(c-2097.56,476.3) -2091.56,476.3 ccw(c-2097.56,476.3) -2097.56,482.3 -2169.44,482.3 ccw(c-2169.44,476.3) -2175.44,476.3 ccw(c-2169.44,476.3)
GND on Bottom Solder "NONET_L01_P-001" (solid): -2097.63,417.17 -2169.5,417.17 ccw(c-2169.5,411.17) -2175.5,411.17 ccw(c-2169.5,411.17) -2169.5,405.17 -2097.63,405.17 ccw(c-2097.63,411.17) -2091.63,411.17 ccw(c-2097.63,411.17)
GND on Bottom Solder "NONET_L01_P-001" (solid): -2169.75,643.97 -2097.88,643.97 ccw(c-2097.88,649.97) -2091.88,649.97 ccw(c-2097.88,649.97) -2097.88,655.97 -2169.75,655.97 ccw(c-2169.75,649.97) -2175.75,649.97 ccw(c-2169.75,649.97)
GND on Bottom Solder "NONET_L01_P-001" (solid): -2169.82,600.55 -2097.94,600.55 ccw(c-2097.94,606.55) -2091.94,606.55 ccw(c-2097.94,606.55) -2097.94,612.55 -2169.82,612.55 ccw(c-2169.82,606.55) -2175.82,606.55 ccw(c-2169.82,606.55)
GND on Bottom Solder "NONET_L01_P-001" (solid): -2097.5,504.01 -2169.37,504.01 ccw(c-2169.37,498.01) -2175.37,498.01 ccw(c-2169.37,498.01) -2169.37,492.01 -2097.5,492.01 ccw(c-2097.5,498.01) -2091.5,498.01 ccw(c-2097.5,498.01)
GND on Bottom Solder "NONET_L01_P-001" (solid): -2169.5,426.88 -2097.63,426.88 ccw(c-2097.63,432.88) -2091.63,432.88 ccw(c-2097.63,432.88) -2097.63,438.88 -2169.5,438.88 ccw(c-2169.5,432.88) -2175.5,432.88 ccw(c-2169.5,432.88)
GND on Bottom Solder "NONET_L01_P-001" (solid): -2097.69,395.46 -2169.56,395.46 ccw(c-2169.56,389.46) -2175.56,389.46 ccw(c-2169.56,389.46) -2169.56,383.46 -2097.69,383.46 ccw(c-2097.69,389.46) -2091.69,389.46 ccw(c-2097.69,389.46)
GND on Bottom Solder "NONET_L01_P-001" (solid): -2169.56,578.84 -2097.69,578.84 ccw(c-2097.69,584.84) -2091.69,584.84 ccw(c-2097.69,584.84) -2097.69,590.84 -2169.56,590.84 ccw(c-2169.56,584.84) -2175.56,584.84 ccw(c-2169.56,584.84)
GND on Bottom Solder "NONET_L01_P-001" (solid): -2169.37,513.72 -2097.5,513.72 ccw(c-2097.5,519.72) -2091.5,519.72 ccw(c-2097.5,519.72) -2097.5,525.72 -2169.37,525.72 ccw(c-2169.37,519.72) -2175.37,519.72 ccw(c-2169.37,519.72)
C1 on Bottom Solder "NONET_L01_P-001" (solid): -2721.7,471.02 -2649.83,471.02 ccw(c-2649.83,477.02) -2643.83,477.02 ccw(c-2649.83,477.02) -2649.83,483.02 -2721.7,483.02 ccw(c-2721.7,477.02) -2727.7,477.02 ccw(c-2721.7,477.02)
C1 on Bottom Solder "NONET_L01_P-001" (solid): -2721.63,492.91 -2649.76,492.91 ccw(c-2649.76,498.91) -2643.76,498.91 ccw(c-2649.76,498.91) -2649.76,504.91 -2721.63,504.91 ccw(c-2721.63,498.91) -2727.63,498.91 ccw(c-2721.63,498.91)
C1 on Bottom Solder "NONET_L01_P-001" (solid): -2721.63,514.79 -2649.76,514.79 ccw(c-2649.76,520.79) -2643.76,520.79 ccw(c-2649.76,520.79) -2649.76,526.79 -2721.63,526.79 ccw(c-2721.63,520.79) -2727.63,520.79 ccw(c-2721.63,520.79)
C1 on Bottom Solder "NONET_L01_P-001" (solid): -2721.89,536.68 -2650.02,536.68 ccw(c-2650.02,542.68) -2644.02,542.68 ccw(c-2650.02,542.68) -2650.02,548.68 -2721.89,548.68 ccw(c-2721.89,542.68) -2727.89,542.68 ccw(c-2721.89,542.68)
C1 on Bottom Solder "NONET_L01_P-001" (solid): -2618.57,471.02 -2546.7,471.02 ccw(c-2546.7,477.02) -2540.7,477.02 ccw(c-2546.7,477.02) -2546.7,483.02 -2618.57,483.02 ccw(c-2618.57,477.02) -2624.57,477.02 ccw(c-2618.57,477.02)
C1 on Bottom Solder "NONET_L01_P-001" (solid): -2618.5,492.9 -2546.63,492.9 ccw(c-2546.63,498.9) -2540.63,498.9 ccw(c-2546.63,498.9) -2546.63,504.9 -2618.5,504.9 ccw(c-2618.5,498.9) -2624.5,498.9 ccw(c-2618.5,498.9)
C1 on Bottom Solder "NONET_L01_P-001" (solid): -2618.5,514.79 -2546.63,514.79 ccw(c-2546.63,520.79) -2540.63,520.79 ccw(c-2546.63,520.79) -2546.63,526.79 -2618.5,526.79 ccw(c-2618.5,520.79) -2624.5,520.79 ccw(c-2618.5,520.79)
C1 on Bottom Solder "NONET_L01_P-001" (solid): -2618.76,536.68 -2546.89,536.68 ccw(c-2546.89,542.68) -2540.89,542.68 ccw(c-2546.89,542.68) -2546.89,548.68 -2618.76,548.68 ccw(c-2618.76,542.68) -2624.76,542.68 ccw(c-2618.76,542.68)
C1 on Bottom Solder "NONET_L01_P-001" (solid): -2515.44,471.01 -2443.57,471.01 ccw(c-2443.57,477.01) -2437.57,477.01 ccw(c-2443.57,477.01) -2443.57,483.01 -2515.44,483.01 ccw(c-2515.44,477.01) -2521.44,477.01 ccw(c-2515.44,477.01)
C1 on Bottom Solder "NONET_L01_P-001" (solid): -2515.37,492.9 -2443.5,492.9 ccw(c-2443.5,498.9) -2437.5,498.9 ccw(c-2443.5,498.9) -2443.5,504.9 -2515.37,504.9 ccw(c-2515.37,498.9) -2521.37,498.9 ccw(c-2515.37,498.9)
C1 on Bottom Solder "NONET_L01_P-001" (solid): -2515.37,514.79 -2443.5,514.79 ccw(c-2443.5,520.79) -2437.5,520.79 ccw(c-2443.5,520.79) -2443.5,526.79 -2515.37,526.79 ccw(c-2515.37,520.79) -2521.37,520.79 ccw(c-2515.37,520.79)
C1 on Bottom Solder "NONET_L01_P-001" (solid): -2515.63,536.68 -2443.76,536.68 ccw(c-2443.76,542.68) -2437.76,542.68 ccw(c-2443.76,542.68) -2443.76,548.68 -2515.63,548.68 ccw(c-2515.63,542.68) -2521.63,542.68 ccw(c-2515.63,542.68)
C1 on Bottom Solder "NONET_L01_P-001" (solid): -2412.5,536.68 -2340.63,536.68 ccw(c-2340.63,542.68) -2334.63,542.68 ccw(c-2340.63,542.68) -2340.63,548.68 -2412.5,548.68 ccw(c-2412.5,542.68) -2418.5,542.68 ccw(c-2412.5,542.68)
C1 on Bottom Solder "NONET_L01_P-001" (solid): -2412.24,514.79 -2340.37,514.79 ccw(c-2340.37,520.79) -2334.37,520.79 ccw(c-2340.37,520.79) -2340.37,526.79 -2412.24,526.79 ccw(c-2412.24,520.79) -2418.24,520.79 ccw(c-2412.24,520.79)
C1 on Bottom Solder "NONET_L01_P-001" (solid): -2340.37,504.9 -2412.24,504.9 ccw(c-2412.24,498.9) -2418.24,498.9 ccw(c-2412.24,498.9) -2412.24,492.9 -2340.37,492.9 ccw(c-2340.37,498.9) -2334.37,498.9 ccw(c-2340.37,498.9)
C1 on Bottom Solder "NONET_L01_P-001" (solid): -2412.31,471.01 -2340.44,471.01 ccw(c-2340.44,477.01) -2334.44,477.01 ccw(c-2340.44,477.01) -2340.44,483.01 -2412.31,483.01 ccw(c-2412.31,477.01) -2418.31,477.01 ccw(c-2412.31,477.01)
C1 on Bottom Solder "NONET_L01_P-001" (solid): -2340.44,461.13 -2412.31,461.13 ccw(c-2412.31,455.13) -2418.31,455.13 ccw(c-2412.31,455.13) -2412.31,449.13 -2340.44,449.13 ccw(c-2340.44,455.13) -2334.44,455.13 ccw(c-2340.44,455.13)
C1 on Bottom Solder "NONET_L01_P-001" (solid): -2412.37,427.24 -2340.5,427.24 ccw(c-2340.5,433.24) -2334.5,433.24 ccw(c-2340.5,433.24) -2340.5,439.24 -2412.37,439.24 ccw(c-2412.37,433.24) -2418.37,433.24 ccw(c-2412.37,433.24)
C1 on Bottom Solder "NONET_L01_P-001" (solid): -2340.5,417.35 -2412.37,417.35 ccw(c-2412.37,411.35) -2418.37,411.35 ccw(c-2412.37,411.35) -2412.37,405.35 -2340.5,405.35 ccw(c-2340.5,411.35) -2334.5,411.35 ccw(c-2340.5,411.35)
C1 on Bottom Solder "NONET_L01_P-001" (solid): -2340.56,373.57 -2412.44,373.57 ccw(c-2412.44,367.57) -2418.44,367.57 ccw(c-2412.44,367.57) -2412.44,361.57 -2340.56,361.57 ccw(c-2340.56,367.57) -2334.56,367.57 ccw(c-2340.56,367.57)
C1 on Bottom Solder "NONET_L01_P-001" (solid): -2412.44,383.46 -2340.56,383.46 ccw(c-2340.56,389.46) -2334.56,389.46 ccw(c-2340.56,389.46) -2340.56,395.46 -2412.44,395.46 ccw(c-2412.44,389.46) -2418.44,389.46 ccw(c-2412.44,389.46)
C2- on Bottom Solder "NONET_L01_P-001" (solid): -2234,704.68 cw(c-2234,710.68) -2240,710.68 cw(c-2234,710.68) -2234,716.68 -2201.13,716.68 cw(c-2201.13,710.68) -2195.13,710.68 cw(c-2201.13,710.68) -2201.13,704.68
C2- on Bottom Solder "NONET_L01_P-001" (solid): -2167,704.68 cw(c-2167,710.68) -2173,710.68 cw(c-2167,710.68) -2167,716.68 -2134.13,716.68 cw(c-2134.13,710.68) -2128.13,710.68 cw(c-2134.13,710.68) -2134.13,704.68
C2- on Bottom Solder "NONET_L01_P-001" (solid): -2032.44,751.68 -1999.56,751.68 ccw(c-1999.56,757.68) -1993.56,757.68 ccw(c-1999.56,757.68) -1999.56,763.68 -2032.44,763.68 ccw(c-2032.44,757.68) -2038.44,757.68 ccw(c-2032.44,757.68)
C2- on Bottom Solder "NONET_L01_P-001" (solid): -2032.44,727.91 cw(c-2032.44,733.91) -2038.44,733.91 cw(c-2032.44,733.91) -2032.44,739.91 -1999.57,739.91 cw(c-1999.57,733.91) -1993.57,733.91 cw(c-1999.57,733.91) -1999.57,727.91
C2- on Bottom Solder "NONET_L01_P-001" (solid): -2032,704.68 cw(c-2032,710.68) -2038,710.68 cw(c-2032,710.68) -2032,716.68 -1999.13,716.68 cw(c-1999.13,710.68) -1993.13,710.68 cw(c-1999.13,710.68) -1999.13,704.68
C2 on Bottom Solder "NONET_L01_P-001" (solid): -220.56,353.01 -220.56,753.8 cw(c-216.02,753.8) -216.02,758.34 -157.11,758.34 cw(c-157.11,753.8) -152.56,753.8 -152.56,353.01 cw(c-158.17,353.01) -158.17,347.41 -214.96,347.41 cw(c-214.96,353.01)
C2 on Bottom Solder "NONET_L01_P-001" (solid): -378.44,353.01 -378.44,753.8 cw(c-373.9,753.8) -373.9,758.34 -314.99,758.34 cw(c-314.99,753.8) -310.44,753.8 -310.44,353.01 cw(c-316.05,353.01) -316.05,347.41 -372.84,347.41 cw(c-372.84,353.01)
C2 on Bottom Solder "NONET_L01_P-001" (solid): -453.8,354.41 -453.8,752.41 ccw(c-460.8,752.41) -460.8,759.41 ccw(c-460.8,752.41) -467.8,752.41 -467.8,354.41 ccw(c-460.8,354.41) -460.8,347.41 ccw(c-460.8,354.41)
C2 on Bottom Solder "NONET_L01_P-001" (solid): -85.56,354.41 -85.56,752.41 cw(c-78.56,752.41) -78.56,759.41 cw(c-78.56,752.41) -71.56,752.41 -71.56,354.41 cw(c-78.56,354.41) -78.56,347.41 cw(c-78.56,354.41)
C1 on Bottom Layer "C1_L02_P000" (solid, pour order 0): -2738.56,550.68 -2329.56,550.68 -2329.56,324.81 -1982.28,324.81 -1982.28,-16.32 -2508.56,-16.32 cw(c-2508.57,6.68) -2531.56,6.68 -2531.56,341.68 ccw(c-2553.56,341.69) -2553.56,363.68 -2564.56,363.68 ccw(c-2564.57,340.68) -2587.56,340.68 -2587.56,67.46 -2587.56,57.42 cw(c-2601.82,56.94) -2601.35,42.68 -2607.56,42.68 cw(c-2610,61.36) -2627.31,53.93 -2677.37,160.49 -2685.27,168.39 ccw(c-2755.97,97.73) -2755.98,197.68 -2823.98,197.68 cw(c-2823.98,216.27) -2842.56,216.27 -2842.56,409.26 -2738.56,409.26
GND on Bottom Layer "GND_L02_P004" (solid, pour order 4): -1753.48,258.6 -1701.56,206.68 -1575.25,206.68 -1575.25,513.68 -1518.56,513.68 -1518.56,-9.32 -1960.56,-9.32 -1960.56,373.68 -2313.56,373.68 -2313.56,453.33 -1759.25,453.33 -1759.25,512.68 -1702.56,512.68 -1702.56,406.43 -1753.48,355.51
GND on Bottom Layer "GND_L02_P002" (solid, pour order 2): -2430,738.68 -2430,682.68 -2078.56,682.68 -2078.56,373.68 -2313.56,373.68 -2313.56,567.68 -2734.56,567.68 -2734.56,587.68 -2847.56,587.68 -2847.56,889.2 cw(c-2827.08,889.2) -2841.56,903.68 cw(c-2829.5,891.62) -2829.49,908.68 -2751.98,908.68 ccw(c-2751.98,1008.68) -2681.27,937.97 -2674.56,944.68 -2632.56,1037.68 cw(c-2607.56,1037.68) -2607.56,1062.68 -2606.56,1062.68 cw(c-2606.56,1043.68) -2587.56,1043.68 -2587.56,762.68 ccw(c-2563.56,762.68) -2563.56,738.68

## Other copper
Top Layer:
  rectangle net GND: -2015,530 -1996,557
  rectangle net NetC3_2: -2101.96,464.22 -2031.96,525.67
  rectangle net THRM: -1812.92,636.15 -1785.36,678.28
  rectangle net C2-: -2415.35,699 -1932,988
  rectangle net C2-: -2415.35,657.14 -2125.63,837.68
  rectangle net THRM: -1692.06,468.68 -1603.06,498.68
  rectangle net NetC3_2: -2101.96,464.42 -1958.6,518.68
  rectangle net NetC3_2: -2101.96,464.22 -2031.96,525.67
  rectangle net NetC3_2: -1976.6,464.42 -1958.6,555.18
  rectangle net NetC4_2: -1931.07,377.41 -1857.56,499.42
  rectangle net NetC4_2: -1931.07,464.42 -1857.56,499.42
  rectangle net GND: -2843.19,701.68 -2737.56,895.37
  rectangle net C1: -2831.06,204.76 -2680.42,230.78
  rectangle net C1: -2842.56,230.78 -2680.42,409.26
  rectangle net C2: -486.22,-9.84 -53.15,1112.21
  rectangle net ALRT: -1812.92,539.09 -1785.36,549.44
  rectangle net NetC4_2: -1931.07,377.41 -1902.29,563.68
Bottom Layer:
  rectangle net C2-: -2524.06,762.68 -1834,1112.21
  rectangle net C1: -2837.12,203.12 -2717.72,353.46
  rectangle net C1: -2842.56,296.37 -2717.72,409.26
  rectangle net C1: -2495.56,209.32 -2329.56,550.68
  rectangle net C1: -2495.56,-16.32 -1982.28,324.81
  rectangle net GND: -1575.25,440.68 -1518.56,513.68
  rectangle net GND: -1759.25,439.68 -1702.56,512.68
  rectangle net GND: -2057.72,473.68 -1849.56,682.68
  rectangle net C2-: -2415.35,697.68 -1982.28,1112.21
  rectangle net GND: -2843.19,701.68 -2737.56,895.37
  rectangle net C2: -486.22,-9.84 -53.15,1112.21

## Silkscreen, mask and mechanical layers (free items; w line width, h text height)
Top Overlay:
  lines w5: -2020,538 -2049.56,538 -2049.56,690 -1950,690 ; -1954.79,455.46 -1954.79,424.68 -2008.56,424.68 -2008.56,513.68 -1975.1,513.68 -1811.56,513.68 -1811.56,505.42 ; -1954.43,537.68 -1950,537.68 ; -1949.63,537.68 -1949.63,689.68 ; -1736.48,747.5 -1736.48,771.48 ; -1727.27,461.68 -1727.27,250.23 -1592.53,250.23 ; -1678.97,453.33 -1678.97,465.68 ; -1669.04,764.83 -1675.04,758.83 -1675.04,771.48 ; -1668.38,765.48 -1662.39,771.48 -1675.04,771.48 ; -1656.06,701.23 -1656.06,752.51 -1675.04,771.48 ; -1617.56,747.5 -1617.56,771.48 ; -1612.68,453.33 -1612.68,465.68 ; -1551.14,766.74 -1557.14,760.74 -1557.14,773.4 ; -1550.48,767.4 -1544.49,773.4 -1557.14,773.4 ; -1537.15,702.13 -1537.15,753.4 -1557.14,773.4 ; -1592.53,250.23 -1601.98,240.78 -1601.98,250.23 -1601.98,259.68 -1592.53,250.23 ; -2573.3,459.37 -2478.3,459.37 -2478.3,642.37 -2573.3,642.37 -2573.3,459.37 ; -1940.56,239.68 -1760.89,239.68 -1760.89,299.68 -1940.56,299.68 -1940.56,239.68
  text "*" at -2084.12,589.32 h39.37
  text "*" at -2608.37,532.53 h39.37
  text "^" at -1993.89,416.02 h40
  text "^" at -1913.36,193.09 h40
Bottom Overlay: